# Altium PCB Vitrine.PcbDoc
Units mm, origin at the board's own origin, x right, y up, seen from the top; angles counter-clockwise.
Board outline 69 x 83 mm, 2 copper layers (Top Layer, Bottom Layer); 33 components, 19 nets, 129 pads, 9 vias.
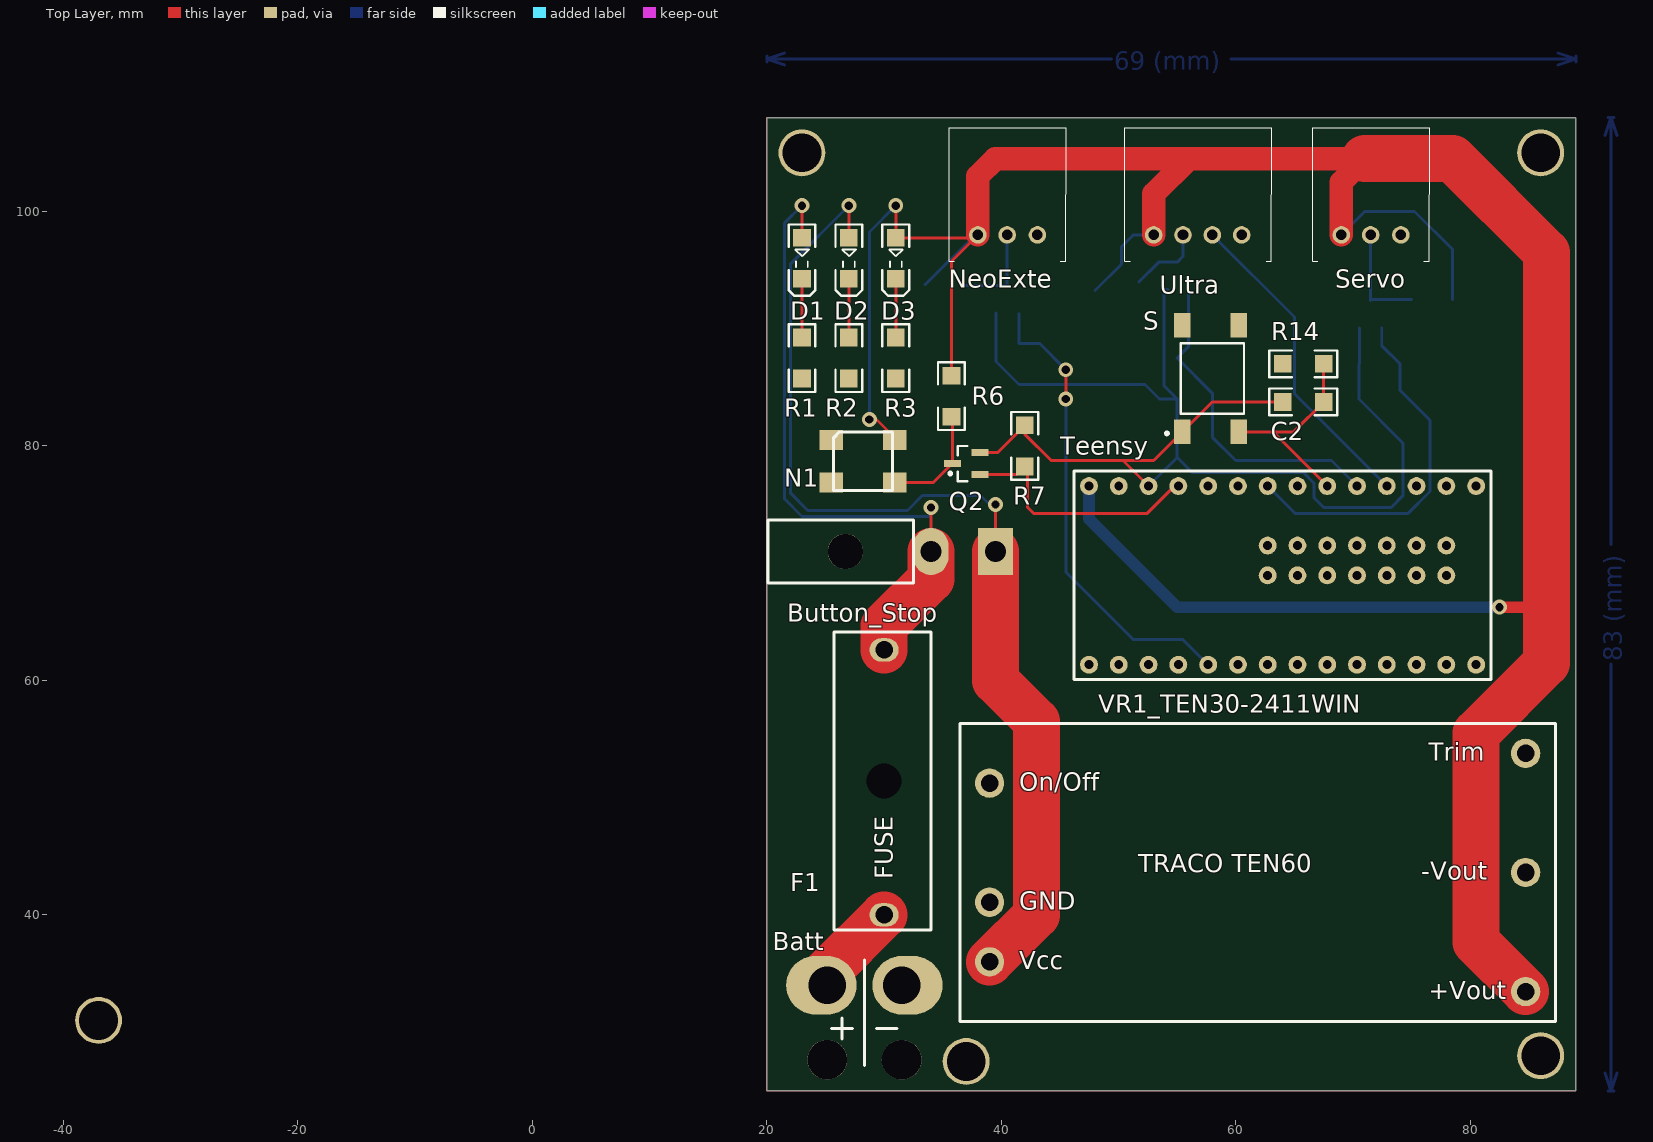
[diagram p0: Top Layer view]
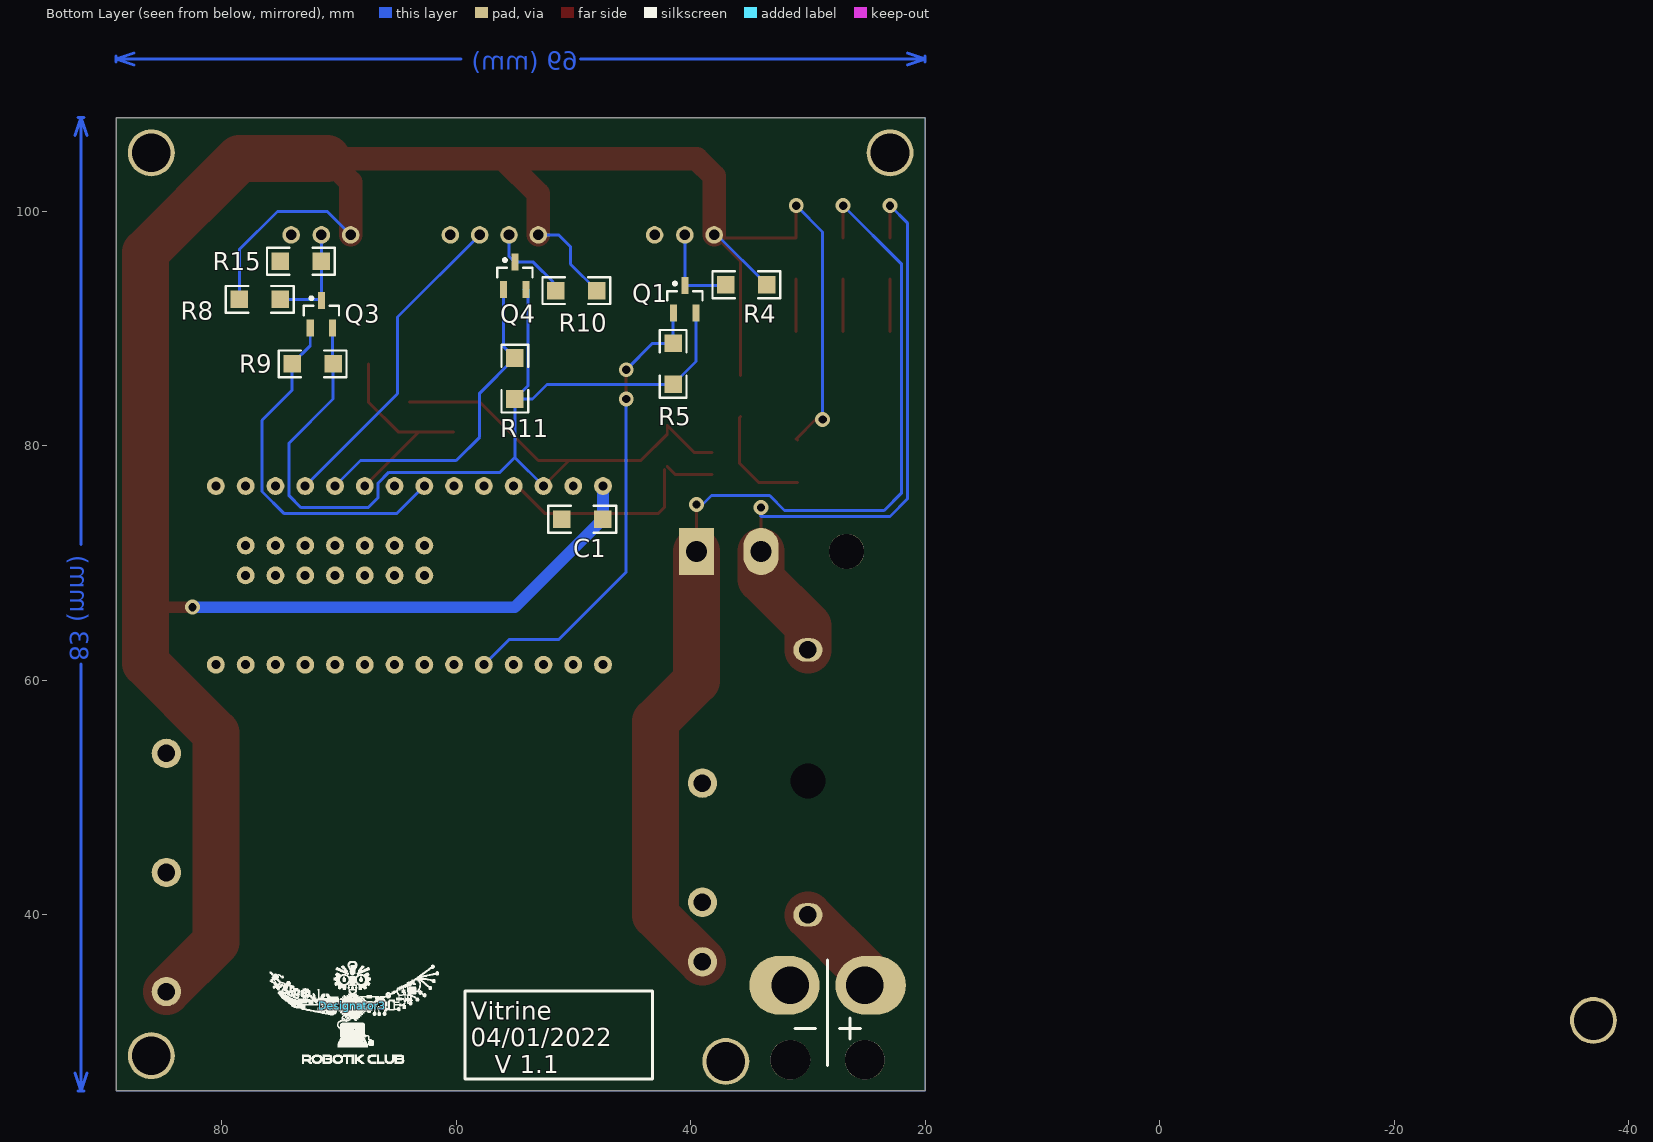
[diagram p1: Bottom Layer view, seen from below]

## Layer stack, top to bottom
Top Solder: solder mask 0.0102, Solder Resist, Dk 3.5
Top Layer: signal copper 0.0356
Dielectric 1: dielectric 0.32, FR-4, Dk 4.8
Bottom Layer: signal copper 0.0356
Bottom Solder: solder mask 0.0102, Solder Resist, Dk 3.5

## Board outline
20,25 89,25 89,66 89,108 58,108 20,108

## Design rules (kind name [scope] priority, off if disabled: settings)
Clearance [All] p1: gap=0.254
HoleSize [All] p1: absolutevalues=TRUE maxlimit=4 minlimit=0.025 maxpercent=80.000 minpercent=20.000
PolygonConnect [All] p1: connectstyle=Relief reliefconductorwidth=0.254 reliefentries=4 polygonreliefangle="90 Angle" airgapwidth=0.254
RoutingVias [All] p1: holewidth=0.711 width=1.27 viastyle="Through Hole" minholewidth=0.711 minwidth=1.27 maxholewidth=0.711 maxwidth=1.27
SolderMaskExpansion [All] p1: expansion=0.102
Width [All] p1: maxlimit=4 minlimit=0.254 preferedwidth=0.254
29 further rules are at their usual default settings.

## Components (designator, comment, footprint, x,y, rotation, side; value= is the part's Value field where it differs from the comment)
Batt "" "Battery SALE" 31.5,34 r180 top
Button_Stop "Header 2" Molex_MiniFitJr_2x1H 34,71 r180 top
C1 "Cap" "Capacitor 1206" 49.25,73.75 r180 bottom
C2 "Cap" "Capacitor 1206" 65.75,83.75 r180 top
D1 "LED2" KP-3216SEC 23,96 r270 top
D2 "LED2" KP-3216SEC 27,96 r270 top
D3 "LED2" KP-3216SEC 31,96 r270 top
Designator3 "Comment" Logo_lowres 68.881,32.25 r180 bottom
F1 "5A" Fuse 30,40 r90 top
N1 "WS2812C" Neopixel 25.5,80.5 r0 top
NeoExte "Header 3H" S3B-XH-A 38,98 r0 top
Q1 "MOSFET-N" SOT23_M 40.5,92.5 r90 bottom
Q2 "MOSFET-N" SOT23_M 37,78.5 r180 top
Q3 "MOSFET-N" SOT23_M 71.5,91.25 r90 bottom
Q4 "MOSFET-N" SOT23_M 55,94.5 r90 bottom
R1 "" "Resistor 1206" 23,87.5 r90 top
R2 "" "Resistor 1206" 27,87.5 r90 top
R3 "" "Resistor 1206" 31,87.5 r90 top
R4 "" "Resistor 1206" 35.25,93.75 r180 bottom
R5 "" "Resistor 1206" 41.5,87 r270 bottom
R6 "" "Resistor 1206" 35.75,84.25 r90 top
R7 "" "Resistor 1206" 42,80 r90 top
R8 "" "Resistor 1206" 76.75,92.5 r0 bottom
R9 "" "Resistor 1206" 72.25,87 r180 bottom
R10 "" "Resistor 1206" 49.75,93.25 r180 bottom
R11 "" "Resistor 1206" 55,85.75 r270 bottom
R14 "" "Resistor 1206" 65.75,87 r0 top
R15 "" "Resistor 1206" 73.25,95.75 r180 bottom
S "4-1437565-1" FSM-SWITCH 58,85.75 r180 top
Servo "Header 3H" S3B-XH-A 69,98 r0 top
Teensy "Teensy 3.2" Teensy_A_PMI 48.5,64.5 r90 top
Ultra "Header 4H" S4B-XH-A 53,98 r0 top
VR1_TEN30-2411WIN "" TRACO_2x1inch 39,36 r0 top

## Footprints (in the part's own frame and the unit in brackets; to place one, negate y for a bottom-side part, rotate by r counter-clockwise, add the part's x,y. Pads: shape width x height; smd on the part's side, far side on the other; paste and mask are expansions set on the pad)
"Battery SALE" [mm] "Connecteur Batterie"
  round 3.4 hole 3.4: 0(0,6.35) 0(6.35,6.35)
  oval 6x5 hole 3.2 copper offset -0.5,0: 1(0,0)
  oval 6x5 hole 3.2 copper offset 0.5,0: 2(6.35,0)
  silkscreen extent 0.38,-2.16 5.97,6.86
"Capacitor 1206" [mm]
  rect 1.5x1.5 smd: 1(-1.75,0) 2(1.75,0)
  silkscreen extent -2.89,-1.14 2.89,1.14, body extent -1.98,-0.99 1.98,0.96, height 1.3
FSM-SWITCH [mm]
  rect 1.4x2.1 smd: 1(2.55,4.55) 2(2.55,-4.55) 3(-2.25,4.55) 4(-2.25,-4.55)
  silkscreen extent -2.7,-3 4,4.8, body extent -2.87,-5 3.13,5, height 5.1
Fuse [mm] "Porte-fusible monté sur circuit 10 (UL) A, 6.3 (VDE) A, fusible Cartouche, 893-0574"
  round 2 hole 3: 0(11.43,0)
  oval 2x2.5 hole 1.5: 1(0,0) 2(22.6,0)
  silkscreen extent -1.27,-4 24.13,4.25, body extent -1.27,-4.29 24.13,4.29, height 11.41
KP-3216SEC [mm]
  rect 1.5x1.5 smd: 1(-1.75,0) 2(1.75,0)
  silkscreen extent -2.89,-1.14 3.2,1.14, body extent -1.7,-0.79 1.5,0.81, height 1.1
Logo_lowres [mm]
  silkscreen extent -7.01,-4.93 7.39,3.76
Molex_MiniFitJr_2x1H [mm] "Connecteur Molex 2"
  rect 3x4 hole 1.8: 1(-5.5,0)
  oval 3x4 hole 1.8: 2(0,0)
  round 3 hole 3 unplated: 3(7.3,0)
  silkscreen extent 1.5,-2.7 13.9,2.7, body extent -6.03,-2.7 13.9,3.1, height 11.01
Neopixel [mm]
  rect 2x1.7 smd: 1(5.4,0) 2(0,0) 3(0,-3.6) 4(5.4,-3.6)
  silkscreen extent 0.2,-4.3 5.2,0.7, body extent 0.19,-4.33 5.19,0.67, height 2
"Resistor 1206" [mm]
  rect 1.5x1.5 smd: 1(-1.75,0) 2(1.75,0)
  silkscreen extent -2.89,-1.14 2.89,1.14, body extent -1.98,-0.95 1.98,0.93, height 0.55
S3B-XH-A [mm]
  round 1.5 hole 0.9: 1(0,0) 2(2.5,0) 3(5.08,0)
  silkscreen extent -2.45,-2.26 7.54,9.14, body extent -2.44,-2.27 7.46,9.23, height 6.15
S4B-XH-A [mm]
  round 1.5 hole 0.9: 1(0,0) 2(2.5,0) 3(5,0) 4(7.5,0)
  silkscreen extent -2.45,-2.26 10.08,9.14, body extent -2.44,-2.32 9.96,9.18, height 6.15
SOT23_M [mm] "SOT23, 3-Leads, Body 2.9x1.3mm, Pitch 0.95mm, Lead Span 2.3mm - Reverse Pinning, IPC Low Density"
  rect 1.45x0.6 smd: 1(1.175,0) 2(-1.175,-0.95) 3(-1.175,0.95)
  silkscreen extent -0.1,-1.5 1.47,1.5, body extent -0.7,-1.5 0.7,1.5, height 1.1
Teensy_A_PMI [mil]
  round 60 hole 30: 0(-124.41,-59.84) 1(-124.41,-159.84) 2(-124.41,-259.84) 3(-124.41,-359.84) 4(-124.41,-459.84) 5(-124.41,-559.84) 6(-124.41,-659.84) 7(-124.41,-759.84) 8(-124.41,-859.84) 9(-124.41,-959.84) 10(-124.41,-1059.84) 11(-124.41,-1159.84) 12(-124.41,-1259.84) 13(475.59,-1259.84) 14(475.59,-1159.84) 15(475.59,-1059.84) 16(475.59,-959.84) 17(475.59,-859.84) 18(475.59,-759.84) 19(475.59,-659.84) 20(475.59,-559.84) 21(475.59,-459.84) 22(475.59,-359.84) 23(475.59,-259.84) 24(175.59,-759.84) 25(175.59,-859.84) 26(175.59,-959.84) 27(175.59,-1059.84) 28(175.59,-1159.84) 29(275.59,-1159.84) 30(275.59,-1059.84) 31(275.59,-959.84) 32(275.59,-859.84) 33(275.59,-759.84) 36(175.59,-559.84) 37(275.59,-559.84) 39(275.59,-659.84) 40(175.59,-659.84) 41(475.59,-159.84) 42(475.59,-59.84) 43(475.59,40.16) 44(-124.41,40.16)
  silkscreen extent -174,-1310 526,90, body extent -176,-1310 527,147, height 505
TRACO_2x1inch [mm]
  round 2.5 hole 1.5: 1(0,0) 2(0,5.08) 3(0,15.24) 4(45.72,-2.54) 5(45.72,7.62) 6(45.72,17.78)
  silkscreen extent -2.54,-5.08 48.26,20.32, body extent -2.54,-5.08 48.26,20.32, height 10.21

## Part data
Batt: library part "Header 2", "Header, 2-Pin"
Button_Stop: "Header, 2-Pin"
C1 C2: "Capacitor"
D1 D2 D3: "Typical RED, GREEN, YELLOW, AMBER GaAs LED"
F1: library part "Fuse 2", "Fuse"
N1: library part NeoPixel
NeoExte Servo: "Header, 3-Pin, Right Angle"
Q1 Q2 Q3 Q4: "N-Channel MOSFET"
R1 R2 R3 R4 R5 R6 R7 R8 R9 R10 R11 R14 R15: library part Res2, "Resistor"
S: "Switch"
Teensy: library part teensy3.2_A_PMI, "teensy3.2_A_PMI"
Ultra: "Header, 4-Pin, Right Angle"
VR1_TEN30-2411WIN: library part TEN50, "TRACO TEN50"

## Free pads (board coordinates)
  round 4 hole 3.3: 0(-37,31) 0(23,105) 0(37,27.5) 0(86,28) 0(86,105)

## Via types
v1: diameter 1.27, hole 0.711, Top Layer to Bottom Layer, 8 vias
v2: diameter 1.27/1.27 (per signal layer), hole 0.711, Top Layer to Bottom Layer, 1 vias

## Nets (pads, with @x,y where several pads share a name; then routed paths per layer and width w, separated by ;. In a path a pad name is that pad's centre, name@x,y a point inside that pad or via, vN(x,y) a via of type N, cw(c..) or ccw(c..) an arc to the next point about the centre after c; other vN are vias at no path point)
3V: C2.2 Q1.2 Q2.2 Q3.2 Q4.2 R5.2 R7.2 R9.2 R11.2 S.1 Teensy.41 | length 111.1
  Top Layer w0.254: Q2.2 39.7,79.45 R7.2 42,81 44.25,78.75 50.39,78.75 ; Teensy.41 50.39,78.75 ; C2.2 58,83.75 S.1 53,78.75 50.39,78.75
  Bottom Layer w0.254: Q1.2 39.55,87.2 R5.2 52.25,85.25 53.5,84 R11.2 ; Teensy.41 55,79.02 ; Q4.2@54.214,93.325 Q4.2 53.869,93.325 53.869,85.131 R11.2 ; Q3.2 70.55,87.05 R9.2 70.5,84 74.25,80.25 74.25,75.75 73.258,74.758 67.5,74.758 66.657,75.601 66.657,76.843 65.75,77.75 56.27,77.75 55,79.02 ; 55,79.02 R11.2
5V: C1.2 D3.1 N1.1 NeoExte.1 R4.2 R6.2 R8.2 R10.2 Servo.1 Teensy.43 Ultra.1 VR1_TEN30-2411WIN.4 | length 259.4
  Top Layer w0.254: v2(28.75,82.25) 29.35,82.25 31,80.6 N1.1 ; v1(31,100.5) D3.1 NeoExte.1@37.75,97.75 ; R6.2 35.75,95.75 NeoExte.1@37.75,97.75 ; NeoExte.1 NeoExte.1@37.75,97.75
  Top Layer w1: v1(82.5,66.25) 86.5,66.25
  Top Layer w2: NeoExte.1 38,103 39.5,104.5 56,104.5 ; Ultra.1 53,101.5 56,104.5 ; Servo.1 69,102.5 71,104.5 56,104.5
  Top Layer w4: 71,104.5 78.5,104.5 86.5,96.5 86.5,66.25 86.5,61.5 80.5,55.5 80.5,37.68 VR1_TEN30-2411WIN.4
  Bottom Layer w0.254: v2(28.75,82.25) 28.75,98.25 v1(31,100.5) ; R4.2 37.75,98 NeoExte.1 ; R10.2 50.25,95.5 50.25,97 51.25,98 Ultra.1 ; Servo.1 71,100 75.25,100 78.5,96.75 R8.2
  Bottom Layer w1: C1.2@47.48,73.77 Teensy.43 ; C1.2 55,66.25 v1(82.5,66.25)
ECHO_ULTRA: Teensy.16 Ultra.3 | length 27.6
  Bottom Layer w0.254: Ultra.3 65,91 65,84.46 Teensy.16
GND: Batt.1 C1.1 N1.3 NeoExte.3 R1.1 R2.1 R3.1 R14.1 R15.1 Servo.3 Teensy.40 Teensy.42 Teensy.44 Ultra.4 VR1_TEN30-2411WIN.2 VR1_TEN30-2411WIN.5
NEOEXTE: NeoExte.2 Q1.1 R4.1 | length 7.9
  Bottom Layer w0.254: R4.1@36.925,93.675 Q1.1 NeoExte.2
NEOPIXEL: N1.4 Q2.1 R6.1 | length 9.6
  Top Layer w0.254: N1.4 34.225,76.9 Q2.1 35.825,82.425 R6.1
NetBatt_2: Batt.2 F1.1 | length 8
  Top Layer w4: Batt.2 25.15,35.15 F1.1
NetD1_2: D1.2 R1.2 | length 4.5
  Top Layer w0.254: R1.2@23,89.75 D1.2
NetD2_2: D2.2 R2.2 | length 4.5
  Top Layer w0.254: R2.2@27,89.75 D2.2
NetD3_2: D3.2 R3.2 | length 4.5
  Top Layer w0.254: R3.2@31,89.75 D3.2
SERVO: Q3.1 R8.1 R15.2 Servo.2 | length 9
  Bottom Layer w0.254: Q3.1 R15.2 Servo.2 ; Q3.1@71.575,92.5 R8.1
T_BUTTONBN: C2.1 R14.2 S.3 Teensy.18 | length 18.1
  Top Layer w0.254: S.3 63.18,81.2 ; R14.2 C2.1 64.95,81.2 63.18,81.2 ; Teensy.18 63.18,81.2
T_NEOEXTE: Q1.3 R5.1 Teensy.3 | length 40.1
  Top Layer w0.254: v1(45.5,84) v1(45.5,86.5)
  Bottom Layer w0.254: Q1.3@41.5,91.275 R5.1 43.25,88.75 v1(45.5,86.5) ; v1(45.5,84) 45.5,69.25 51.25,63.5 55.48,63.5 Teensy.3
T_NEOPIXEL: Q2.3 R7.1 Teensy.23 | length 21.8
  Top Layer w0.254: Q2.3 41.3,77.55 R7.1 ; R7.1@42.25,78 42.25,74.75 42.75,74.25 52.45,74.25 55.1,76.9 Teensy.23
T_SERVO: Q3.3 R9.1 Teensy.20 | length 31.2
  Bottom Layer w0.254: Teensy.20 65.05,74.25 74.706,74.25 76.563,76.107 76.563,82.187 74,84.75 R9.1 72.45,88.55 Q3.3
T_TRIG_ULTRA: Q4.3 R11.1 Teensy.17 | length 28.3
  Bottom Layer w0.254: Q4.3 55.95,88.45 R11.1 58,84.5 58,80.75 60,78.75 68.17,78.75 Teensy.17
TRIG_ULTRA: Q4.1 R10.1 Ultra.2 | length 6.5
  Bottom Layer w0.254: R10.1@51.75,94 53.425,95.675 Q4.1 55.5,96.175 Ultra.2
V_BATT: Button_Stop.2 D1.1 F1.2 | length 56.1
  Top Layer w0.254: D1.1 v1(23,100.5) ; Button_Stop.2 v1(34,74.75)
  Top Layer w4: F1.2 30,64.656 34,68.656 Button_Stop.2
  Bottom Layer w0.254: v1(23,100.5) 21.492,98.992 21.492,75.508 23.008,73.992 33.992,73.992 34,74 v1(34,74.75)
V_BATT_A: Button_Stop.1 D2.1 VR1_TEN30-2411WIN.1 | length 91.1
  Top Layer w0.254: D2.1 v1(27,100.5) ; Button_Stop.1 39.5,71.018 39.5,74.5 v1(39.5,75)
  Top Layer w4: VR1_TEN30-2411WIN.1 43,40 43,56.5 39.5,60 Button_Stop.1@39.5,71.018
  Bottom Layer w0.254: v1(27,100.5) 22,95.5 22,76 23.5,74.5 32,74.5 33.266,75.766 38.234,75.766 39.5,74.5 v1(39.5,75)
pads on no net: Batt.0 Button_Stop.3 F1.0 N1.2 S.2 S.4 Teensy.0 Teensy.1 Teensy.2 Teensy.4 Teensy.5 Teensy.6 Teensy.7 Teensy.8 Teensy.9 Teensy.10 Teensy.11 Teensy.12 Teensy.13 Teensy.14 Teensy.15 Teensy.19 Teensy.21 Teensy.22 Teensy.24 Teensy.25 Teensy.26 Teensy.27 Teensy.28 Teensy.29 Teensy.30 Teensy.31 Teensy.32 Teensy.33 Teensy.36 Teensy.37 Teensy.39 VR1_TEN30-2411WIN.3 VR1_TEN30-2411WIN.6
copper on no net: | length 146.5
  Bottom Layer w0.254: 20,112.746 20,113.254 ; 21.524,112.492 20,113 ; 21.524,113.508 20,113 ; 49.396,113 20,113 ; 59.604,113 89,113 ; 87.476,112.492 89,113 ; 87.476,113.508 89,113 ; 89,112.746 89,113.254 ; 91.492,26.524 92,25 ; 91.492,106.476 92,108 ; 91.746,25 92.254,25 ; 91.746,108 92.254,108 ; 92,61.396 92,25 ; 92,71.604 92,108 ; 92.508,26.524 92,25 ; 92.508,106.476 92,108

## Polygon pours and split planes (outlines as drawn)
GND on Top Layer "Copper_GND" (solid, remove dead copper, shelved, pour order 2): 20,108 20,25 89,25 89,108
GND on Bottom Layer "Copper_GND" (solid, remove dead copper, shelved, pour order 4): 20,108 89,108 89,25 20,25

## Other copper
Bottom Layer:
  text "69 (mm)" at 49.65,112.086 h1.52
  text "83 (mm)" at 92.914,61.65 h1.52 r90

## Silkscreen, mask and mechanical layers (free items; w line width, h text height)
Bottom Overlay:
  lines w0.254: 43.25,26 59.25,26 59.25,33.5 43.25,33.5 43.25,26
  text "Vitrine / 04/01/2022 /    V 1.1" at 58.75,26.5 h1.52
Mechanical 1:
  the board outline again, w1.2

## Text inside footprints (layer, text, board x,y; h text height)
F1: Top Overlay "FUSE" at 30.762,43.048 h1.52 r90
VR1_TEN30-2411WIN: Top Overlay "Trim" at 76.465,53.145 h1.52; Top Overlay "-Vout" at 75.83,42.985 h1.52; Top Overlay "+Vout" at 76.465,32.825 h1.52; Top Overlay "On/Off" at 41.54,50.605 h1.52; Top Overlay "GND" at 41.54,40.445 h1.52; Top Overlay "Vcc" at 41.54,35.365 h1.52; Top Overlay "TRACO TEN60" at 51.7,43.62 h1.52